# Altium PCB 0.PCB1.PcbDoc (part 2 of 12)
Units mm, origin at the board's own origin, x right, y up, seen from the top; angles counter-clockwise.
Board outline 77 x 72 mm, 6 copper layers (Top Layer, Layer 1, Layer 3, Layer 4, Layer 2, Bottom Layer), stack 1.538 mm thick; 570 components, 490 nets, 3331 pads, 1909 vias.
Unrouted connection lines stored in the file: 2.
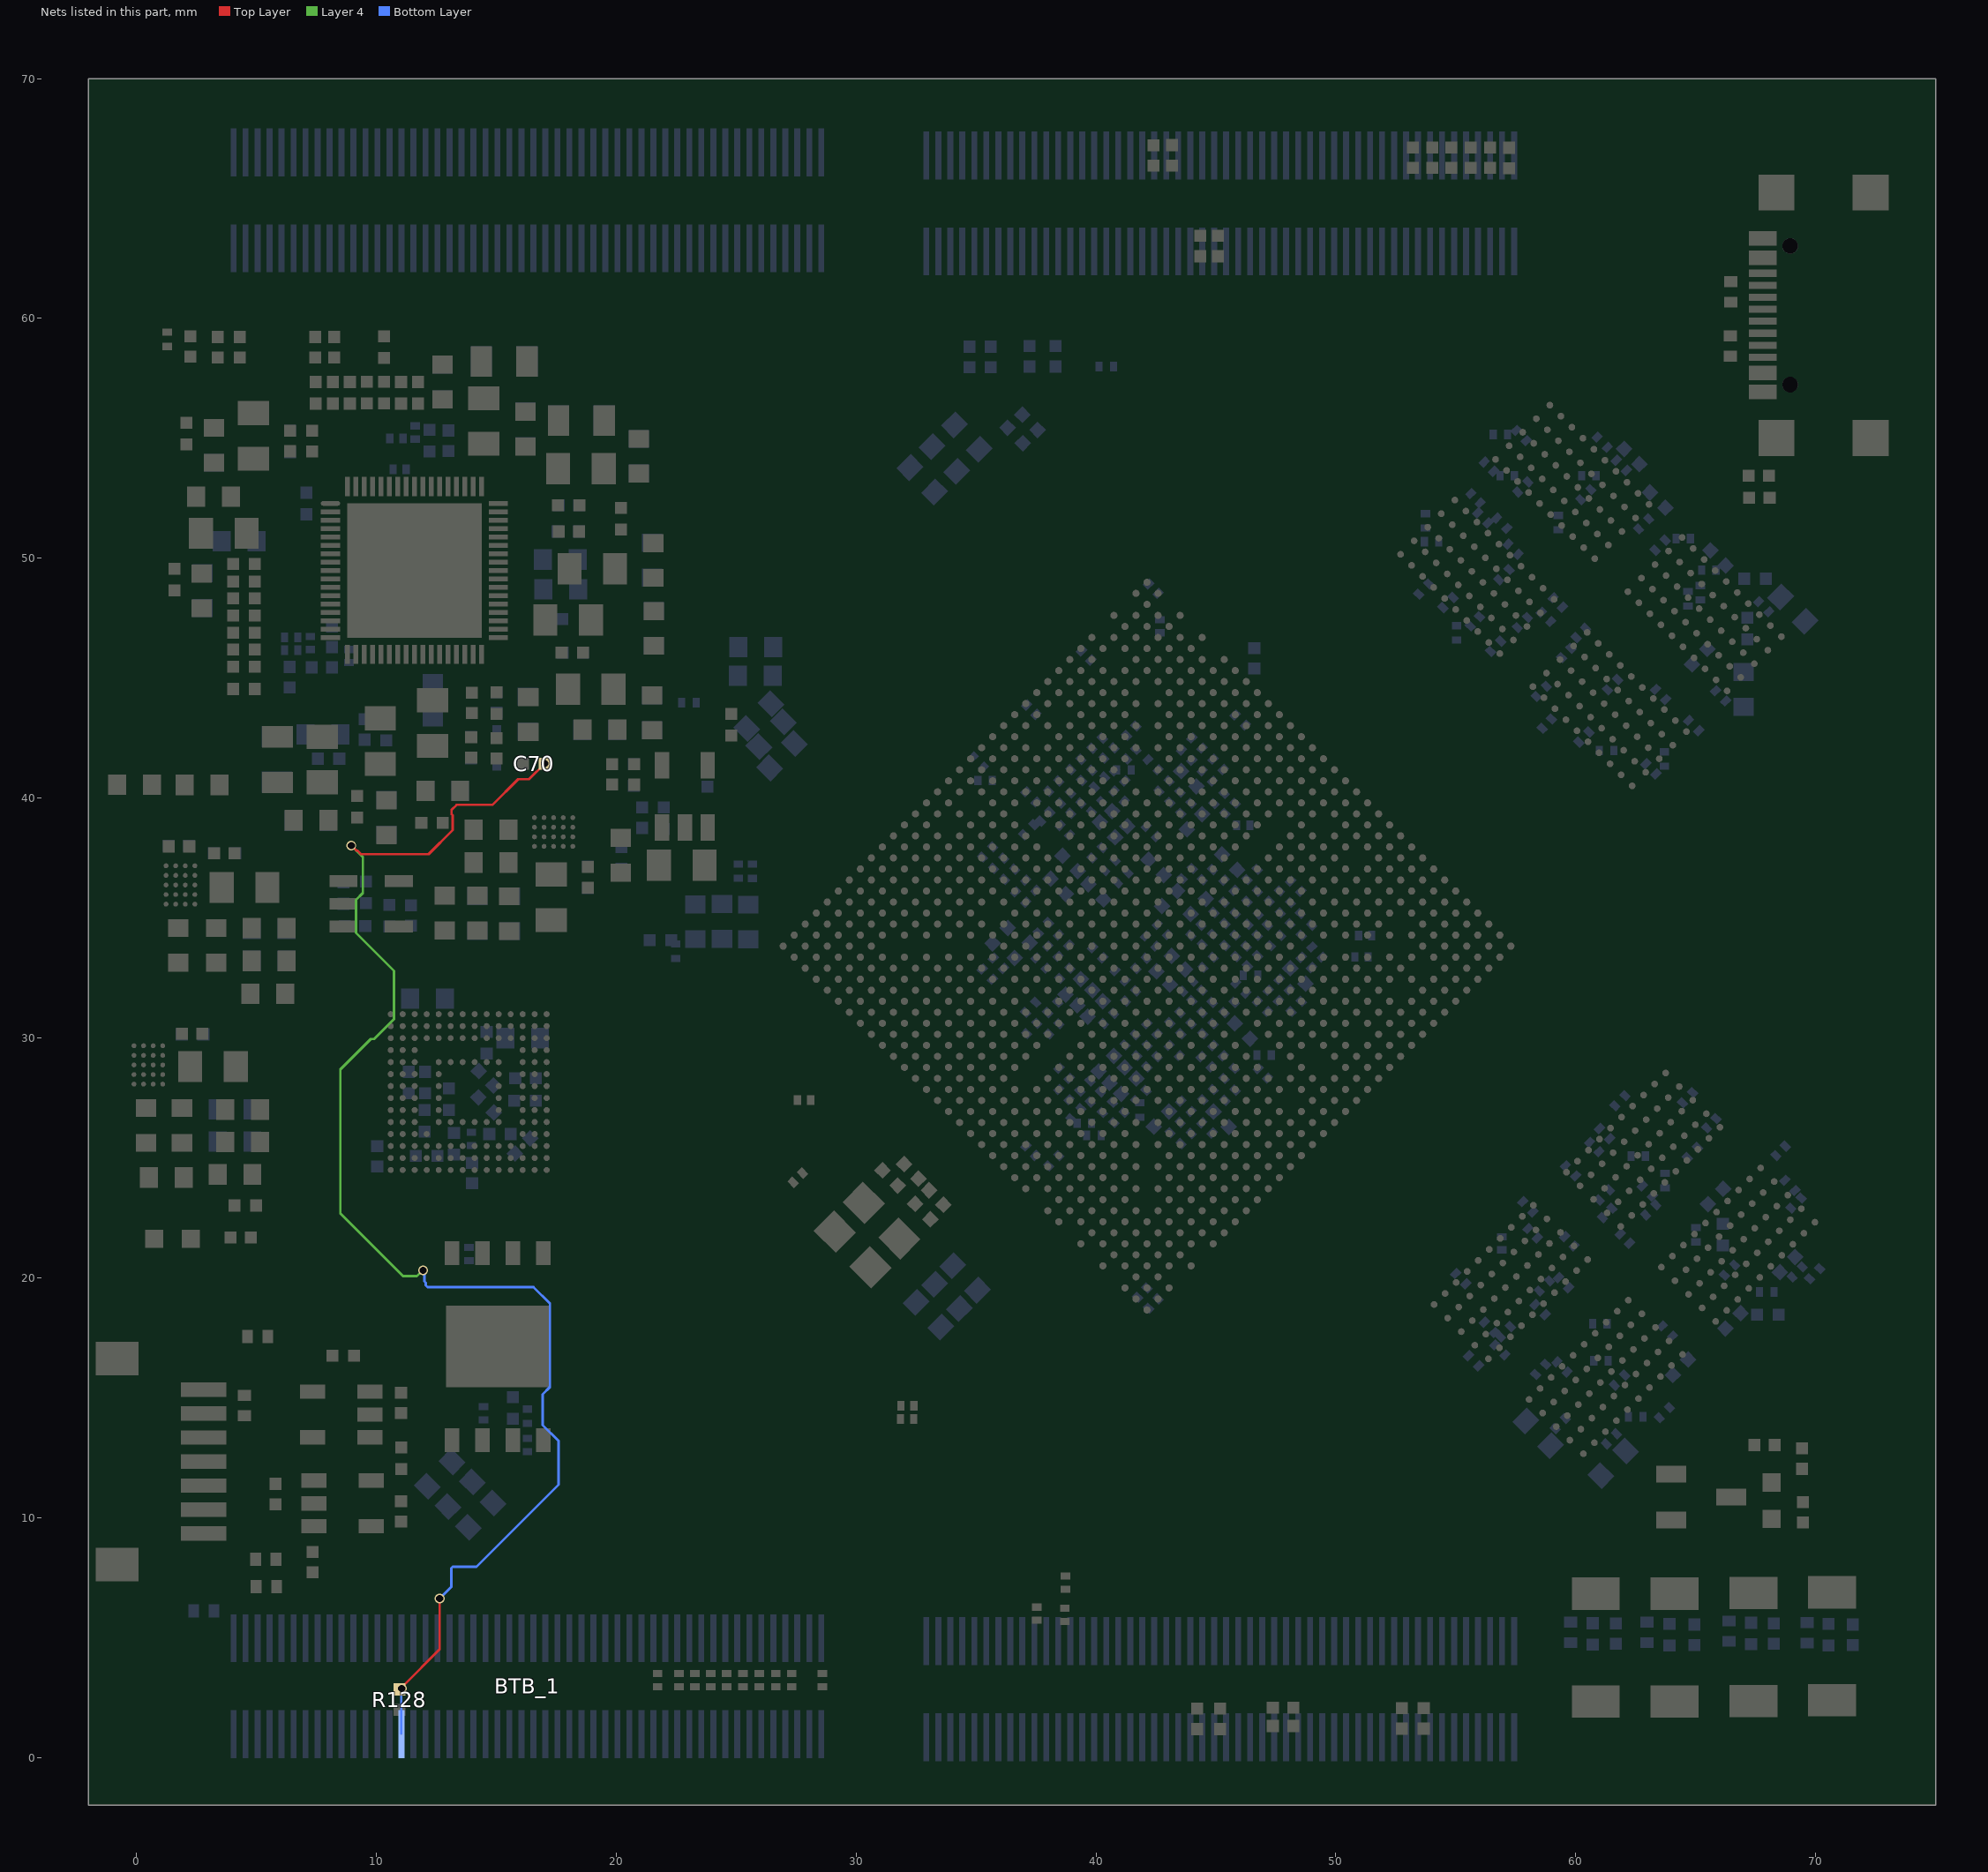
[diagram p6: the nets of this part, all layers, seen from the top]

## Components (designator, comment, footprint, x,y, rotation, side; value= is the part's Value field where it differs from the comment) (continued)
R30 "510K" R0402_L 33.34,23.345 r135 top
R31 "0R" R0201_L 37.281,25.296 r135 bottom
R32 "0R" R0201_L 10.84,54.989 r0 bottom
R33 "22R" R0201_L 7.254,46.467 r270 bottom
R34 "22R" R0201_L 32.133,14.115 r180 top
R35 "22R" R0201_L 8.859,45.921 r90 bottom
R36 "22R" R0201_L 32.14,14.664 r180 top
R37 "100K" R0201_L 6.456,46.167 r0 bottom
R38 "100K" R0201_L 11.627,55.243 r270 bottom
R39 "2.2K" R0201_L 37.535,5.992 r90 top
R40 "120K" R0201_L 6.456,46.696 r0 bottom
R41 "2.2K" R0201_L 38.729,7.288 r270 top
R42 "120K" R0201_L 10.972,53.712 r0 bottom
R43 "2.2K" R0201_L 38.704,5.941 r90 top
R44 "2.2K" R0201_L 28.595,3.224 r90 top
R45 "240R" R0201_L 46.146,38.86 r180 bottom
R46 "240R" R0201_L 51.226,34.262 r0 bottom
R47 "240R" R0201_L 51.074,33.373 r0 bottom
R48 "240R" R0201_L 46.959,28.522 r315 bottom
R49 "1K" R0402_L 69.438,12.457 r90 top
R50 "10K" R0402_L 67.871,13.023 r180 top
R51 "0R" R0201_L 27.574,24.168 r225 top
R52 "0R" R0201_L 27.833,27.412 r180 top
R53 "22R" R0402_L 46.603,45.826 r90 bottom
R54 "200R" R0201_L 37.307,43.686 r315 bottom
R55 "8.2K" R0201_L 37.882,39.232 r225 bottom
R56 "200R" R0201_L 39.593,45.946 r315 bottom
R57 "200R" R0201_L 41.472,41.832 r225 bottom
R58 "200R" R0201_L 41.473,42.809 r45 bottom
R59 "8.2K" R0201_L 38.704,38.657 r315 bottom
R60 "10K" R0402_L 2.255,58.824 r270 top
R61 "1K" R0402_L 37.231,58.418 r270 bottom
R62 "100K" R0402_L 4.312,58.799 r270 top
R63 "10K" R0402_L 38.323,58.418 r90 bottom
R64 "NC" R0402_L 3.398,58.799 r90 top
R65 "0R" R0402_L 8.249,58.799 r270 top
R67 "NC" R0402_L 7.462,58.799 r270 top
R69 "8.2K" R0201_L 42.666,47.166 r270 bottom
R70 "8.2K" R0201_L 42.396,48.732 r135 bottom
R72 "200R" R0201_L 41.93,19.378 r45 bottom
R73 "200R" R0201_L 42.395,18.923 r225 bottom
R83 "10K" R0201_L 55.798,47.369 r45 bottom
R84 "10K" R0201_L 58.795,43.102 r45 bottom
R85 "240R" R0201_L 55.823,52.5 r135 bottom
R86 "240R" R0201_L 56.382,53.82 r135 bottom
R87 "49.9R" R0201_L 58.764,47.552 r135 bottom
R88 "49.9R" R0201_L 59.608,46.048 r45 bottom
R89 "49.9R" R0201_L 59.252,48.156 r135 bottom
R90 "49.9R" R0201_L 60.218,46.886 r45 bottom
R93 "10K" R0201_L 60.776,25.449 r315 bottom
R94 "10K" R0201_L 56.916,21.435 r270 bottom
R95 "240R" R0201_L 65.653,26.439 r45 bottom
R96 "240R" R0201_L 68.54,25.287 r45 bottom
R97 "49.9R" R0201_L 61.311,22.702 r45 bottom
R98 "49.9R" R0201_L 58.203,21.857 r315 bottom
R99 "49.9R" R0201_L 62.054,21.634 r135 bottom
R100 "49.9R" R0201_L 59.738,21.517 r315 bottom
R101 "0R" R0201_L 25.971,3.221 r270 top
R102 "0R" R0201_L 25.286,3.217 r270 top
R103 "0R" R0603_L 12.138,31.641 r180 bottom
R104 "0R" R0603_L 16.102,29.991 r180 bottom
R105 "10K" R0402_L 10.039,25.066 r90 bottom
R106 "10K" R0402_L 16.221,28.319 r180 bottom
R107 "10K" R0402_L 14.577,28.319 r315 bottom
R108 "NC" R0402_L 13.992,24.364 r90 bottom
R109 "NC" R0201_L 16.301,13.024 r270 bottom
R110 "NC" R0201_L 13.868,20.983 r270 bottom
R111 "0R" R0201_L 23.279,3.217 r270 top
R112 "0R" R0201_L 24.6,3.217 r270 top
R113 "0R" R0201_L 23.939,3.221 r270 top
R114 "0R" R0201_L 22.619,3.217 r270 top
R115 "0R" R0201_L 21.73,3.217 r270 top
R116 "0R" R0201_L 26.657,3.217 r270 top
R117 "0R" R0201_L 27.318,3.217 r270 top
R118 "0R" R0201_L 13.967,25.784 r90 bottom
R119 "0R" R0201_L 14.472,14.344 r90 bottom
R120 "0R" R0402_L 45.181,1.605 r90 top
R121 "0R" R0402_L 44.216,1.605 r90 top
R122 "100R" R0402_L 7.346,8.136 r90 top
R123 "0R" R0402_L 11.033,10.251 r90 top
R124 "0R" R0402_L 52.75,1.623 r90 top
R125 "0R" R0402_L 53.664,1.623 r90 top
R126 "100R" R0402_L 5.797,10.981 r90 top
R127 "0R" R0402_L 11.033,14.779 r90 top
R128 "0R" R0402_L 10.967,2.411 r270 top
R129 "2.2R" R0402_L 67.66,52.525 r180 top
R130 "0R" R0402_L 45.079,63.015 r270 top
R131 "2.2R" R0402_L 67.634,53.439 r180 top
R132 "0R" R0402_L 44.343,63.015 r270 top
R133 "100R" R0402_L 61.675,5.162 r270 bottom
R134 "NC" R0402_L 43.174,66.8 r270 top
R135 "4.7K" R0402_L 42.406,66.79 r270 top
R136 "100R" R0402_L 64.951,5.111 r270 bottom
R137 "4.7K" R0402_L 4.351,21.673 r0 top
R138 "100R" R0402_L 68.253,5.162 r270 bottom
R139 "NC" R0402_L 57.22,66.691 r90 top
R140 "NC" R0402_L 54.807,66.698 r90 top
R141 "NC" R0402_L 54.02,66.698 r90 top
R142 "100R" R0402_L 71.555,5.111 r270 bottom
R143 "NC" R0402_L 53.207,66.698 r90 top
R144 "NC" R0402_L 56.433,66.698 r90 top
R145 "NC" R0402_L 55.62,66.698 r90 top
R146 "NC" R0402_L 47.799,2.07 r0 top
R147 "NC" R0402_L 47.799,1.308 r0 top
SW1 "GT-TC029B-H020-L1N" SW-SMD_L3.9-W2.9-P4.15-LS5.0 60.839,4.574 r90 top
SW2 "GT-TC029B-H020-L1N" SW-SMD_L3.9-W2.9-P4.15-LS5.0 64.115,4.574 r90 top
SW3 "GT-TC029B-H020-L1N" SW-SMD_L3.9-W2.9-P4.15-LS5.0 67.417,4.599 r90 top
SW4 "GT-TC029B-H020-L1N" SW-SMD_L3.9-W2.9-P4.15-LS5.0 70.692,4.629 r90 top
U1 "PMIC_RK806" QFN68_7R00X7R00X0R80_T 11.59,49.489 r0 top
U2 "B5819WT" SOD-523_L1.2-W0.8-LS1.6-RD 15.019,42.067 r90 bottom
U3 "RK860-2" WLCSP-20_L2.0-W1.6-R5-C4-P0.40-TL 1.707,36.376 r0 top
U4 "LPW5209AB5F" SOT-23-5_L3.0-W1.7-P0.95-LS2.8-BL 10.346,38.222 r270 top
U5 "RK860-3" WLCSP-20_L2.0-W1.6-R5-C4-P0.40-TL 0.369,28.871 r0 top
U6 "RK860-2" WLCSP-20_L2.0-W1.6-R5-C4-P0.40-TL 17.393,38.714 r270 top
U7 "RT8097CHGB" SOT-23-5_L3.0-W1.7-P0.95-LS2.8-BR 22.863,40.068 r270 top
U8 "RK3588" BGA1088_23R00X23R00X2R00 42.13,33.826 r225 top locked
U9 "CXDB5CCAM-ML" FBGA-200_L15.0-W10.0-BL_K4F6E3S4HM 60.426,48.395 r315 top locked
U10 "CXDB5CCAM-ML" FBGA-200_L15.0-W10.0-BL_K4F6E3S4HM 61.986,20.81 r225 top
U11 "KLMBG2JETD-B041" FBGA-153 13.852,27.741 r0 top
U12 "W25Q256JWEIQ_C2980994" WSON-8_L8.0-W6.0-P1.27-TL-EP-1 15.056,17.279 r270 top
U13 "D2315-3R3" DFN1006-2L-BI 66.441,58.85 r90 top
U14 "SN74LVC1G125DBVR" SOT23-5 8.594,10.588 r0 top
U15 "D2315-3R3" DFN1006-2L-BI 66.466,61.104 r270 top
U16 "SN74LVC1G125DBVR" SOT23-5 8.543,14.296 r180 top
U17 "D2315-3R3" DFN1006-2L-BI 59.795,5.213 r90 bottom
U18 "D2315-3R3" DFN1006-2L-BI 5.416,7.12 r180 top
U19 "D2315-3R3" DFN1006-2L-BI 5.397,8.263 r180 top
U20 "D2315-3R3" DFN1006-2L-BI 62.97,5.213 r90 bottom
U21 "D2315-3R3" DFN1006-2L-BI 66.399,5.264 r90 bottom
U22 "D2315-3R3" DFN1006-2L-BI 69.65,5.194 r90 bottom
U23 "D2315-3R3" DFN1006-2L-BI 2.809,6.101 r0 bottom
U24 "D2315-3R3" DFN1006-2L-BI 4.498,14.671 r270 top
U25 "D2315-3R3" DFN1006-2L-BI 5.054,17.547 r0 top
USBC1 "ZX-TYPEC-WTM1628" USB-C-SMD_ZX-TYPEC-WTM1628 71.188,60.13 r90 top
X1 "24M" XTAL-3225-4P 30.462,21.778 r315 top

## Footprints (in the part's own frame and the unit in brackets; to place one, negate y for a bottom-side part, rotate by r counter-clockwise, add the part's x,y. Pads: shape width x height; smd on the part's side, far side on the other; paste and mask are expansions set on the pad)
BGA1088_23R00X23R00X2R00 [mm] "BGA1088_23R00X23R00X2R00"
  round 0.3 smd: A1(-10.725,10.725) A2(-10.075,10.725) A3(-9.425,10.725) A4(-8.775,10.725) A5(-8.125,10.725) A6(-7.475,10.725) A7(-6.825,10.725) A8(-6.175,10.725) A9(-5.525,10.725) A10(-4.875,10.725) A11(-4.225,10.725) A12(-3.575,10.725) A13(-2.925,10.725) A14(-2.275,10.725) A15(-1.625,10.725) A16(-0.975,10.725) A17(-0.325,10.725) A18(0.325,10.725) A19(0.975,10.725) A20(1.625,10.725) A21(2.275,10.725) A22(2.925,10.725) A23(3.575,10.725) A24(4.225,10.725) A25(4.875,10.725) A26(5.525,10.725) A27(6.175,10.725) A28(6.825,10.725) A30(8.125,10.725) A32(9.425,10.725) A33(10.075,10.725) A34(10.725,10.725) AA1(-10.725,-2.275) AA2(-10.075,-2.275) AA3(-9.425,-2.275) AA4(-8.775,-2.275) AA5(-8.125,-2.275) AA6(-7.475,-2.275) AA7(-6.825,-2.275) AA8(-6.175,-2.275) AA9(-5.525,-2.275) AA10(-4.875,-2.275) AA11(-4.225,-2.275) AA12(-3.575,-2.275) AA13(-2.925,-2.275) AA14(-2.275,-2.275) AA15(-1.625,-2.275) AA16(-0.975,-2.275) AA17(-0.325,-2.275) AA18(0.325,-2.275) AA19(0.975,-2.275) AA20(1.625,-2.275) AA21(2.275,-2.275) AA22(2.925,-2.275) AA23(3.575,-2.275) AA24(4.225,-2.275) AA25(4.875,-2.275) AA26(5.525,-2.275) AA27(6.175,-2.275) AA28(6.825,-2.275) AA29(7.475,-2.275) AA30(8.125,-2.275) AA31(8.775,-2.275) AA32(9.425,-2.275) AA33(10.075,-2.275) AA34(10.725,-2.275) AB1(-10.725,-2.925) AB2(-10.075,-2.925) AB3(-9.425,-2.925) AB4(-8.775,-2.925) AB5(-8.125,-2.925) AB6(-7.475,-2.925) AB7(-6.825,-2.925) AB8(-6.175,-2.925) AB9(-5.525,-2.925) AB10(-4.875,-2.925) AB11(-4.225,-2.925) AB12(-3.575,-2.925) AB13(-2.925,-2.925) AB14(-2.275,-2.925) AB15(-1.625,-2.925) AB16(-0.975,-2.925) AB17(-0.325,-2.925) AB18(0.325,-2.925) AB19(0.975,-2.925) AB20(1.625,-2.925) AB21(2.275,-2.925) AB22(2.925,-2.925) AB23(3.575,-2.925) AB24(4.225,-2.925) AB25(4.875,-2.925) AB26(5.525,-2.925) AB27(6.175,-2.925) AB28(6.825,-2.925) AB29(7.475,-2.925) AB30(8.125,-2.925) AB31(8.775,-2.925) AB32(9.425,-2.925) AB33(10.075,-2.925) AB34(10.725,-2.925) AC1(-10.725,-3.575) AC2(-10.075,-3.575) AC3(-9.425,-3.575) AC4(-8.775,-3.575) AC5(-8.125,-3.575) AC6(-7.475,-3.575) AC7(-6.825,-3.575) AC8(-6.175,-3.575) AC9(-5.525,-3.575) AC10(-4.875,-3.575) AC11(-4.225,-3.575) AC12(-3.575,-3.575) AC13(-2.925,-3.575) AC14(-2.275,-3.575) AC15(-1.625,-3.575) AC16(-0.975,-3.575) AC17(-0.325,-3.575) AC18(0.325,-3.575) AC19(0.975,-3.575) AC20(1.625,-3.575) AC21(2.275,-3.575) AC22(2.925,-3.575) AC23(3.575,-3.575) AC24(4.225,-3.575) AC25(4.875,-3.575) AC26(5.525,-3.575) AC27(6.175,-3.575) AC28(6.825,-3.575) AC29(7.475,-3.575) AC30(8.125,-3.575) AC31(8.775,-3.575) AC32(9.425,-3.575) AC33(10.075,-3.575) AC34(10.725,-3.575) AD1(-10.725,-4.225) AD2(-10.075,-4.225) AD3(-9.425,-4.225) AD4(-8.775,-4.225) AD5(-8.125,-4.225) AD6(-7.475,-4.225) AD7(-6.825,-4.225) AD8(-6.175,-4.225) AD9(-5.525,-4.225) AD10(-4.875,-4.225) AD11(-4.225,-4.225) AD12(-3.575,-4.225) AD13(-2.925,-4.225) AD14(-2.275,-4.225) AD15(-1.625,-4.225) AD16(-0.975,-4.225) AD17(-0.325,-4.225) AD18(0.325,-4.225) AD19(0.975,-4.225) AD20(1.625,-4.225) AD21(2.275,-4.225) AD22(2.925,-4.225) AD23(3.575,-4.225) AD24(4.225,-4.225) AD25(4.875,-4.225) AD26(5.525,-4.225) AD27(6.175,-4.225) AD28(6.825,-4.225) AD29(7.475,-4.225) AD30(8.125,-4.225) AD31(8.775,-4.225) AD32(9.425,-4.225) AD33(10.075,-4.225) AD34(10.725,-4.225) AE1(-10.725,-4.875) AE2(-10.075,-4.875) AE3(-9.425,-4.875) AE4(-8.775,-4.875) AE5(-8.125,-4.875) AE6(-7.475,-4.875) AE7(-6.825,-4.875) AE8(-6.175,-4.875) AE9(-5.525,-4.875) AE11(-4.225,-4.875) AE12(-3.575,-4.875) AE13(-2.925,-4.875) AE14(-2.275,-4.875) AE15(-1.625,-4.875) AE16(-0.975,-4.875) AE18(0.325,-4.875) AE19(0.975,-4.875) AE20(1.625,-4.875) AE21(2.275,-4.875) AE22(2.925,-4.875) AE23(3.575,-4.875) AE24(4.225,-4.875) AE26(5.525,-4.875) AE27(6.175,-4.875) AE28(6.825,-4.875) AE29(7.475,-4.875) AE30(8.125,-4.875) AE31(8.775,-4.875) AE32(9.425,-4.875) AE33(10.075,-4.875) AE34(10.725,-4.875) AF1(-10.725,-5.525) AF2(-10.075,-5.525) AF3(-9.425,-5.525) AF4(-8.775,-5.525) AF5(-8.125,-5.525) AF6(-7.475,-5.525) AF7(-6.825,-5.525) AF8(-6.175,-5.525) AF11(-4.225,-5.525) AF12(-3.575,-5.525) AF13(-2.925,-5.525) AF14(-2.275,-5.525) AF15(-1.625,-5.525) AF16(-0.975,-5.525) AF18(0.325,-5.525) AF19(0.975,-5.525) AF20(1.625,-5.525) AF21(2.275,-5.525) AF22(2.925,-5.525) AF24(4.225,-5.525) AF25(4.875,-5.525) AF27(6.175,-5.525) AF28(6.825,-5.525) AF29(7.475,-5.525) AF30(8.125,-5.525) AF31(8.775,-5.525) AF32(9.425,-5.525) AF33(10.075,-5.525) AF34(10.725,-5.525) AG1(-10.725,-6.175) AG2(-10.075,-6.175) AG3(-9.425,-6.175) AG4(-8.775,-6.175) AG5(-8.125,-6.175) AG6(-7.475,-6.175) AG7(-6.825,-6.175) AG9(-5.525,-6.175) AG10(-4.875,-6.175) AG11(-4.225,-6.175) AG12(-3.575,-6.175) AG13(-2.925,-6.175) AG14(-2.275,-6.175) AG15(-1.625,-6.175) AG16(-0.975,-6.175) AG18(0.325,-6.175) AG19(0.975,-6.175) AG20(1.625,-6.175) AG21(2.275,-6.175) AG22(2.925,-6.175) AG23(3.575,-6.175) AG24(4.225,-6.175) AG25(4.875,-6.175) AG26(5.525,-6.175) AG28(6.825,-6.175) AG29(7.475,-6.175) AG30(8.125,-6.175) AG31(8.775,-6.175) AG32(9.425,-6.175) AG33(10.075,-6.175) AG34(10.725,-6.175) AH2(-10.075,-6.825) AH3(-9.425,-6.825) AH4(-8.775,-6.825) AH5(-8.125,-6.825) AH6(-7.475,-6.825) AH8(-6.175,-6.825) AH9(-5.525,-6.825) AH10(-4.875,-6.825) AH11(-4.225,-6.825) AH12(-3.575,-6.825) AH13(-2.925,-6.825) AH14(-2.275,-6.825) AH15(-1.625,-6.825) AH16(-0.975,-6.825) AH18(0.325,-6.825) AH19(0.975,-6.825) AH20(1.625,-6.825) AH21(2.275,-6.825) AH22(2.925,-6.825) AH23(3.575,-6.825) AH24(4.225,-6.825) AH25(4.875,-6.825) AH26(5.525,-6.825) AH27(6.175,-6.825) AH29(7.475,-6.825) AH30(8.125,-6.825) AH31(8.775,-6.825) AH32(9.425,-6.825) AH33(10.075,-6.825) AH34(10.725,-6.825) AJ1(-10.725,-7.475) AJ2(-10.075,-7.475) AJ3(-9.425,-7.475) AJ4(-8.775,-7.475) AJ5(-8.125,-7.475) AJ7(-6.825,-7.475) AJ8(-6.175,-7.475) AJ9(-5.525,-7.475) AJ10(-4.875,-7.475) AJ11(-4.225,-7.475) AJ12(-3.575,-7.475) AJ13(-2.925,-7.475) AJ14(-2.275,-7.475) AJ15(-1.625,-7.475) AJ16(-0.975,-7.475) AJ18(0.325,-7.475) AJ19(0.975,-7.475) AJ20(1.625,-7.475) AJ21(2.275,-7.475) AJ22(2.925,-7.475) AJ23(3.575,-7.475) AJ24(4.225,-7.475) AJ25(4.875,-7.475) AJ26(5.525,-7.475) AJ27(6.175,-7.475) AJ28(6.825,-7.475) AJ30(8.125,-7.475) AJ31(8.775,-7.475) AJ32(9.425,-7.475) AJ33(10.075,-7.475) AJ34(10.725,-7.475) AK2(-10.075,-8.125) AK3(-9.425,-8.125) AK4(-8.775,-8.125) AK5(-8.125,-8.125) AK6(-7.475,-8.125) AK7(-6.825,-8.125) AK8(-6.175,-8.125) AK9(-5.525,-8.125) AK10(-4.875,-8.125) AK11(-4.225,-8.125) AK12(-3.575,-8.125) AK13(-2.925,-8.125) AK14(-2.275,-8.125) AK15(-1.625,-8.125) AK16(-0.975,-8.125) AK17(-0.325,-8.125) AK18(0.325,-8.125) AK19(0.975,-8.125) AK20(1.625,-8.125) AK21(2.275,-8.125) AK22(2.925,-8.125) AK23(3.575,-8.125) AK24(4.225,-8.125) AK25(4.875,-8.125) AK26(5.525,-8.125) AK27(6.175,-8.125) AK28(6.825,-8.125) AK29(7.475,-8.125) AK30(8.125,-8.125) AK31(8.775,-8.125) AK32(9.425,-8.125) AK33(10.075,-8.125) AK34(10.725,-8.125) AL1(-10.725,-8.775) AL2(-10.075,-8.775) AL3(-9.425,-8.775) AL4(-8.775,-8.775) AL5(-8.125,-8.775) AL6(-7.475,-8.775) AL7(-6.825,-8.775) AL8(-6.175,-8.775) AL9(-5.525,-8.775) AL10(-4.875,-8.775) AL11(-4.225,-8.775) AL12(-3.575,-8.775) AL13(-2.925,-8.775) AL14(-2.275,-8.775) AL15(-1.625,-8.775) AL16(-0.975,-8.775) AL17(-0.325,-8.775) AL18(0.325,-8.775) AL19(0.975,-8.775) AL20(1.625,-8.775) AL21(2.275,-8.775) AL22(2.925,-8.775) AL23(3.575,-8.775) AL24(4.225,-8.775) AL25(4.875,-8.775) AL26(5.525,-8.775) AL27(6.175,-8.775) AL28(6.825,-8.775) AL29(7.475,-8.775) AL30(8.125,-8.775) AL31(8.775,-8.775) AL32(9.425,-8.775) AL33(10.075,-8.775) AL34(10.725,-8.775) AM2(-10.075,-9.425) AM3(-9.425,-9.425) AM4(-8.775,-9.425) AM5(-8.125,-9.425) AM7(-6.825,-9.425) AM8(-6.175,-9.425) AM9(-5.525,-9.425) AM10(-4.875,-9.425) AM12(-3.575,-9.425) AM14(-2.275,-9.425) AM15(-1.625,-9.425) AM16(-0.975,-9.425) AM17(-0.325,-9.425) AM18(0.325,-9.425) AM20(1.625,-9.425) AM22(2.925,-9.425) AM23(3.575,-9.425) AM24(4.225,-9.425) AM25(4.875,-9.425) AM26(5.525,-9.425) AM27(6.175,-9.425) AM28(6.825,-9.425) AM29(7.475,-9.425) AM30(8.125,-9.425) AM31(8.775,-9.425) AM32(9.425,-9.425) AM33(10.075,-9.425) AM34(10.725,-9.425) AN1(-10.725,-10.075) AN2(-10.075,-10.075) AN3(-9.425,-10.075) AN4(-8.775,-10.075) AN5(-8.125,-10.075) AN6(-7.475,-10.075) AN7(-6.825,-10.075) AN8(-6.175,-10.075) AN9(-5.525,-10.075) AN10(-4.875,-10.075) AN11(-4.225,-10.075) AN12(-3.575,-10.075) AN13(-2.925,-10.075) AN14(-2.275,-10.075) AN15(-1.625,-10.075) AN16(-0.975,-10.075) AN17(-0.325,-10.075) AN18(0.325,-10.075) AN19(0.975,-10.075) AN20(1.625,-10.075) AN21(2.275,-10.075) AN22(2.925,-10.075) AN23(3.575,-10.075) AN24(4.225,-10.075) AN25(4.875,-10.075) AN26(5.525,-10.075) AN27(6.175,-10.075) AN28(6.825,-10.075) AN29(7.475,-10.075) AN30(8.125,-10.075) AN31(8.775,-10.075) AN32(9.425,-10.075) AN33(10.075,-10.075) AN34(10.725,-10.075) AP1(-10.725,-10.725) AP2(-10.075,-10.725) AP4(-8.775,-10.725) AP6(-7.475,-10.725) AP7(-6.825,-10.725) AP8(-6.175,-10.725) AP9(-5.525,-10.725) AP10(-4.875,-10.725) AP11(-4.225,-10.725) AP12(-3.575,-10.725) AP13(-2.925,-10.725) AP14(-2.275,-10.725) AP15(-1.625,-10.725) AP16(-0.975,-10.725) AP17(-0.325,-10.725) AP18(0.325,-10.725) AP19(0.975,-10.725) AP20(1.625,-10.725) AP21(2.275,-10.725) AP22(2.925,-10.725) AP23(3.575,-10.725) AP24(4.225,-10.725) AP25(4.875,-10.725) AP26(5.525,-10.725) AP27(6.175,-10.725) AP28(6.825,-10.725) AP29(7.475,-10.725) AP30(8.125,-10.725) AP31(8.775,-10.725) AP32(9.425,-10.725) AP33(10.075,-10.725) AP34(10.725,-10.725) B1(-10.725,10.075) B2(-10.075,10.075) B3(-9.425,10.075) B4(-8.775,10.075) B5(-8.125,10.075) B6(-7.475,10.075) B7(-6.825,10.075) B8(-6.175,10.075) B9(-5.525,10.075) B10(-4.875,10.075) B11(-4.225,10.075) B12(-3.575,10.075) B13(-2.925,10.075) B14(-2.275,10.075) B15(-1.625,10.075) B16(-0.975,10.075) B17(-0.325,10.075) B18(0.325,10.075) B19(0.975,10.075) B20(1.625,10.075) B21(2.275,10.075) B22(2.925,10.075) B23(3.575,10.075) B24(4.225,10.075) B25(4.875,10.075) B26(5.525,10.075) B27(6.175,10.075) B28(6.825,10.075) B29(7.475,10.075) B30(8.125,10.075) B31(8.775,10.075) B32(9.425,10.075) B33(10.075,10.075) B34(10.725,10.075) C1(-10.725,9.425) C2(-10.075,9.425) C3(-9.425,9.425) C4(-8.775,9.425) C5(-8.125,9.425) C6(-7.475,9.425) C7(-6.825,9.425) C8(-6.175,9.425) C9(-5.525,9.425) C10(-4.875,9.425) C11(-4.225,9.425) C12(-3.575,9.425) C13(-2.925,9.425) C14(-2.275,9.425) C15(-1.625,9.425) C16(-0.975,9.425) C17(-0.325,9.425) C18(0.325,9.425) C19(0.975,9.425) C20(1.625,9.425) C21(2.275,9.425) C22(2.925,9.425) C23(3.575,9.425) C24(4.225,9.425) C25(4.875,9.425) C26(5.525,9.425) C27(6.175,9.425) C28(6.825,9.425) C29(7.475,9.425) C30(8.125,9.425) C31(8.775,9.425) C32(9.425,9.425) C33(10.075,9.425) C34(10.725,9.425) D1(-10.725,8.775) D2(-10.075,8.775) D3(-9.425,8.775) D4(-8.775,8.775) D5(-8.125,8.775) D7(-6.825,8.775) D9(-5.525,8.775) D10(-4.875,8.775) D11(-4.225,8.775) D13(-2.925,8.775) D14(-2.275,8.775) D16(-0.975,8.775) D17(-0.325,8.775) D19(0.975,8.775) D20(1.625,8.775) D21(2.275,8.775) D22(2.925,8.775) D23(3.575,8.775) D24(4.225,8.775) D25(4.875,8.775) D26(5.525,8.775) D27(6.175,8.775) D28(6.825,8.775) D29(7.475,8.775) D30(8.125,8.775) D31(8.775,8.775) D32(9.425,8.775) D33(10.075,8.775) E1(-10.725,8.125) E2(-10.075,8.125) E3(-9.425,8.125) E4(-8.775,8.125) E5(-8.125,8.125) E6(-7.475,8.125) E7(-6.825,8.125) E8(-6.175,8.125) E9(-5.525,8.125) E10(-4.875,8.125) E11(-4.225,8.125) E12(-3.575,8.125) E13(-2.925,8.125) E14(-2.275,8.125) E16(-0.975,8.125) E17(-0.325,8.125) E18(0.325,8.125) E19(0.975,8.125) E20(1.625,8.125) E21(2.275,8.125) E22(2.925,8.125) E23(3.575,8.125) E24(4.225,8.125) E25(4.875,8.125) E26(5.525,8.125) E27(6.175,8.125) E28(6.825,8.125) E29(7.475,8.125) E30(8.125,8.125) E31(8.775,8.125) E32(9.425,8.125) E33(10.075,8.125) E34(10.725,8.125) F1(-10.725,7.475) F2(-10.075,7.475) F3(-9.425,7.475) F4(-8.775,7.475) F5(-8.125,7.475) F7(-6.825,7.475) F8(-6.175,7.475) F9(-5.525,7.475) F10(-4.875,7.475) F11(-4.225,7.475) F12(-3.575,7.475) F13(-2.925,7.475) F14(-2.275,7.475) F15(-1.625,7.475) F16(-0.975,7.475) F18(0.325,7.475) F19(0.975,7.475) F20(1.625,7.475) F21(2.275,7.475) F22(2.925,7.475) F23(3.575,7.475) F24(4.225,7.475) F25(4.875,7.475) F26(5.525,7.475) F27(6.175,7.475) F28(6.825,7.475) F30(8.125,7.475) F31(8.775,7.475) F32(9.425,7.475) F33(10.075,7.475) G1(-10.725,6.825) G2(-10.075,6.825) G3(-9.425,6.825) G4(-8.775,6.825) G6(-7.475,6.825) G8(-6.175,6.825) G9(-5.525,6.825) G10(-4.875,6.825) G11(-4.225,6.825) G12(-3.575,6.825) G13(-2.925,6.825) G14(-2.275,6.825) G15(-1.625,6.825) G16(-0.975,6.825) G18(0.325,6.825) G19(0.975,6.825) G20(1.625,6.825) G21(2.275,6.825) G22(2.925,6.825) G23(3.575,6.825) G24(4.225,6.825) G25(4.875,6.825) G26(5.525,6.825) G27(6.175,6.825) G29(7.475,6.825) G30(8.125,6.825) G31(8.775,6.825) G32(9.425,6.825) G33(10.075,6.825) G34(10.725,6.825) H1(-10.725,6.175) H2(-10.075,6.175) H3(-9.425,6.175) H4(-8.775,6.175) H5(-8.125,6.175) H6(-7.475,6.175) H7(-6.825,6.175) H9(-5.525,6.175) H10(-4.875,6.175) H11(-4.225,6.175) H12(-3.575,6.175) H13(-2.925,6.175) H14(-2.275,6.175) H15(-1.625,6.175) H16(-0.975,6.175) H18(0.325,6.175) H19(0.975,6.175) H20(1.625,6.175) H21(2.275,6.175) H22(2.925,6.175) H23(3.575,6.175) H24(4.225,6.175) H25(4.875,6.175) H26(5.525,6.175) H28(6.825,6.175) H29(7.475,6.175) H30(8.125,6.175) H31(8.775,6.175) H32(9.425,6.175) H33(10.075,6.175) J1(-10.725,5.525) J2(-10.075,5.525) J3(-9.425,5.525) J4(-8.775,5.525) J5(-8.125,5.525) J6(-7.475,5.525) J7(-6.825,5.525) J8(-6.175,5.525) J10(-4.875,5.525) J11(-4.225,5.525) J12(-3.575,5.525) J13(-2.925,5.525) J14(-2.275,5.525) J15(-1.625,5.525) J16(-0.975,5.525) J18(0.325,5.525) J19(0.975,5.525) J20(1.625,5.525) J21(2.275,5.525) J22(2.925,5.525) J23(3.575,5.525) J24(4.225,5.525) J25(4.875,5.525) J27(6.175,5.525) J28(6.825,5.525) J29(7.475,5.525) J30(8.125,5.525) J31(8.775,5.525) J32(9.425,5.525) J33(10.075,5.525) J34(10.725,5.525) K1(-10.725,4.875) K2(-10.075,4.875) K3(-9.425,4.875) K4(-8.775,4.875) K5(-8.125,4.875) K6(-7.475,4.875) K7(-6.825,4.875) K8(-6.175,4.875) K9(-5.525,4.875) K11(-4.225,4.875) K12(-3.575,4.875) K13(-2.925,4.875) K14(-2.275,4.875) K15(-1.625,4.875) K16(-0.975,4.875) K18(0.325,4.875) K19(0.975,4.875) K20(1.625,4.875) K21(2.275,4.875) K22(2.925,4.875) K23(3.575,4.875) K24(4.225,4.875) K26(5.525,4.875) K27(6.175,4.875) K28(6.825,4.875) K29(7.475,4.875) K30(8.125,4.875) K31(8.775,4.875) K32(9.425,4.875) K33(10.075,4.875) K34(10.725,4.875) L1(-10.725,4.225) L2(-10.075,4.225) L3(-9.425,4.225) L4(-8.775,4.225) L5(-8.125,4.225) L6(-7.475,4.225) L7(-6.825,4.225) L8(-6.175,4.225) L9(-5.525,4.225) L10(-4.875,4.225) L11(-4.225,4.225) L12(-3.575,4.225) L13(-2.925,4.225) L14(-2.275,4.225) L15(-1.625,4.225) L16(-0.975,4.225) L17(-0.325,4.225) L18(0.325,4.225) L19(0.975,4.225) L20(1.625,4.225) L21(2.275,4.225) L22(2.925,4.225) L23(3.575,4.225) L24(4.225,4.225) L25(4.875,4.225) L26(5.525,4.225) L27(6.175,4.225) L28(6.825,4.225) L29(7.475,4.225) L30(8.125,4.225) L31(8.775,4.225) L32(9.425,4.225) L33(10.075,4.225) M1(-10.725,3.575) M2(-10.075,3.575) M3(-9.425,3.575) M5(-8.125,3.575) M6(-7.475,3.575) M7(-6.825,3.575) M8(-6.175,3.575) M9(-5.525,3.575) M10(-4.875,3.575) M11(-4.225,3.575) M12(-3.575,3.575) M13(-2.925,3.575) M14(-2.275,3.575) M15(-1.625,3.575) M16(-0.975,3.575) M17(-0.325,3.575) M18(0.325,3.575) M19(0.975,3.575) M20(1.625,3.575) M21(2.275,3.575) M22(2.925,3.575) M23(3.575,3.575) M24(4.225,3.575) M25(4.875,3.575) M26(5.525,3.575) M27(6.175,3.575) M28(6.825,3.575) M29(7.475,3.575) M30(8.125,3.575) M31(8.775,3.575) M32(9.425,3.575) M33(10.075,3.575) M34(10.725,3.575) N1(-10.725,2.925) N2(-10.075,2.925) N3(-9.425,2.925) N4(-8.775,2.925) N5(-8.125,2.925) N6(-7.475,2.925) N7(-6.825,2.925) N8(-6.175,2.925) N9(-5.525,2.925) N10(-4.875,2.925) N11(-4.225,2.925) N12(-3.575,2.925) N13(-2.925,2.925) N14(-2.275,2.925) N15(-1.625,2.925) N16(-0.975,2.925) N17(-0.325,2.925) N18(0.325,2.925) N19(0.975,2.925) N20(1.625,2.925) N21(2.275,2.925) N22(2.925,2.925) N23(3.575,2.925) N24(4.225,2.925) N25(4.875,2.925) N26(5.525,2.925) N27(6.175,2.925) N28(6.825,2.925) N29(7.475,2.925) N30(8.125,2.925) N31(8.775,2.925) N32(9.425,2.925) N33(10.075,2.925) N34(10.725,2.925) P1(-10.725,2.275) P2(-10.075,2.275) P3(-9.425,2.275) P4(-8.775,2.275) P5(-8.125,2.275) P6(-7.475,2.275) P7(-6.825,2.275) P8(-6.175,2.275) P9(-5.525,2.275) P10(-4.875,2.275) P11(-4.225,2.275) P12(-3.575,2.275) P13(-2.925,2.275) P14(-2.275,2.275) P15(-1.625,2.275) P16(-0.975,2.275) P17(-0.325,2.275) P18(0.325,2.275) P19(0.975,2.275) P20(1.625,2.275) P21(2.275,2.275) P22(2.925,2.275) P23(3.575,2.275) P24(4.225,2.275) P25(4.875,2.275) P26(5.525,2.275) P27(6.175,2.275) P28(6.825,2.275) P29(7.475,2.275) P30(8.125,2.275) P31(8.775,2.275) P32(9.425,2.275) P33(10.075,2.275) P34(10.725,2.275) R1(-10.725,1.625) R2(-10.075,1.625) R3(-9.425,1.625) R5(-8.125,1.625) R6(-7.475,1.625) R7(-6.825,1.625) R8(-6.175,1.625) R9(-5.525,1.625) R10(-4.875,1.625) R11(-4.225,1.625) R12(-3.575,1.625) R13(-2.925,1.625) R14(-2.275,1.625) R15(-1.625,1.625) R16(-0.975,1.625) R17(-0.325,1.625) R18(0.325,1.625) R19(0.975,1.625) R20(1.625,1.625) R21(2.275,1.625) R22(2.925,1.625) R23(3.575,1.625) R24(4.225,1.625) R25(4.875,1.625) R26(5.525,1.625) R27(6.175,1.625) R28(6.825,1.625) R29(7.475,1.625) R30(8.125,1.625) R31(8.775,1.625) R32(9.425,1.625) R33(10.075,1.625) R34(10.725,1.625) T1(-10.725,0.975) T2(-10.075,0.975) T3(-9.425,0.975) T4(-8.775,0.975) T5(-8.125,0.975) T6(-7.475,0.975) T7(-6.825,0.975) T8(-6.175,0.975) T9(-5.525,0.975) T10(-4.875,0.975) T11(-4.225,0.975) T12(-3.575,0.975) T13(-2.925,0.975) T14(-2.275,0.975) T15(-1.625,0.975) T16(-0.975,0.975) T17(-0.325,0.975) T18(0.325,0.975) T19(0.975,0.975) T20(1.625,0.975) T21(2.275,0.975) T22(2.925,0.975) T23(3.575,0.975) T24(4.225,0.975) T25(4.875,0.975) T26(5.525,0.975) T27(6.175,0.975) T28(6.825,0.975) T29(7.475,0.975) T30(8.125,0.975) T31(8.775,0.975) T32(9.425,0.975) T33(10.075,0.975) T34(10.725,0.975) U1(-10.725,0.325) U2(-10.075,0.325) U3(-9.425,0.325) U4(-8.775,0.325) U5(-8.125,0.325) U11(-4.225,0.325) U12(-3.575,0.325) U13(-2.925,0.325) U14(-2.275,0.325) U15(-1.625,0.325) U16(-0.975,0.325) U17(-0.325,0.325) U18(0.325,0.325) U19(0.975,0.325) U20(1.625,0.325) U21(2.275,0.325) U22(2.925,0.325) U23(3.575,0.325) U24(4.225,0.325) U30(8.125,0.325) U31(8.775,0.325) U32(9.425,0.325) U33(10.075,0.325) U34(10.725,0.325) V1(-10.725,-0.325) V2(-10.075,-0.325) V3(-9.425,-0.325) V4(-8.775,-0.325) V5(-8.125,-0.325) V6(-7.475,-0.325) V7(-6.825,-0.325) V8(-6.175,-0.325) V9(-5.525,-0.325) V10(-4.875,-0.325) V11(-4.225,-0.325) V12(-3.575,-0.325) V13(-2.925,-0.325) V14(-2.275,-0.325) V15(-1.625,-0.325) V16(-0.975,-0.325) V17(-0.325,-0.325) V18(0.325,-0.325) V19(0.975,-0.325) V20(1.625,-0.325) V21(2.275,-0.325) V22(2.925,-0.325) V23(3.575,-0.325) V24(4.225,-0.325) V25(4.875,-0.325) V26(5.525,-0.325) V27(6.175,-0.325) V28(6.825,-0.325) V29(7.475,-0.325) V30(8.125,-0.325) V31(8.775,-0.325) V32(9.425,-0.325) V33(10.075,-0.325) V34(10.725,-0.325) W1(-10.725,-0.975) W2(-10.075,-0.975) W3(-9.425,-0.975) W4(-8.775,-0.975) W5(-8.125,-0.975) W6(-7.475,-0.975) W7(-6.825,-0.975) W8(-6.175,-0.975) W9(-5.525,-0.975) W10(-4.875,-0.975) W11(-4.225,-0.975) W12(-3.575,-0.975) W13(-2.925,-0.975) W14(-2.275,-0.975) W15(-1.625,-0.975) W16(-0.975,-0.975) W17(-0.325,-0.975) W18(0.325,-0.975) W19(0.975,-0.975) W20(1.625,-0.975) W21(2.275,-0.975) W22(2.925,-0.975) W23(3.575,-0.975) W24(4.225,-0.975) W25(4.875,-0.975) W26(5.525,-0.975) W27(6.175,-0.975) W28(6.825,-0.975) W29(7.475,-0.975) W30(8.125,-0.975) W31(8.775,-0.975) W32(9.425,-0.975) W33(10.075,-0.975) W34(10.725,-0.975) Y1(-10.725,-1.625) Y2(-10.075,-1.625) Y3(-9.425,-1.625) Y4(-8.775,-1.625) Y5(-8.125,-1.625) Y6(-7.475,-1.625) Y7(-6.825,-1.625) Y8(-6.175,-1.625) Y9(-5.525,-1.625) Y10(-4.875,-1.625) Y11(-4.225,-1.625) Y12(-3.575,-1.625) Y13(-2.925,-1.625) Y14(-2.275,-1.625) Y15(-1.625,-1.625) Y16(-0.975,-1.625) Y17(-0.325,-1.625) Y18(0.325,-1.625) Y19(0.975,-1.625) Y20(1.625,-1.625) Y21(2.275,-1.625) Y22(2.925,-1.625) Y23(3.575,-1.625) Y24(4.225,-1.625) Y26(5.525,-1.625) Y27(6.175,-1.625) Y28(6.825,-1.625) Y29(7.475,-1.625) Y30(8.125,-1.625) Y31(8.775,-1.625) Y32(9.425,-1.625) Y33(10.075,-1.625) Y34(10.725,-1.625)
  silkscreen extent -12.5,-12.5 12.5,12.5, body extent -11.5,-11.5 11.5,11.5, height 3.81
C0201_L [mm] "贴片MLCC电容"
  rect 0.3x0.4 smd: 1(-0.3,0) 2(0.3,0)
  silkscreen extent -0.61,-0.38 0.61,0.38, body extent -0.3,-0.15 0.3,0.15, height 0.3
C0402_L [mm] "贴片MLCC电容"
  rect 0.5x0.5 smd: 1(-0.45,0) 2(0.45,0)
  silkscreen extent -0.87,-0.46 0.88,0.46, body extent -0.5,-0.25 0.5,0.25, height 0.5
C0603_L [mm] "贴片MLCC电容"
  rect 0.75x0.85 smd: 1(-0.725,0) 2(0.725,0)
  silkscreen extent -1.35,-0.69 1.35,0.69, body extent -0.8,-0.4 0.8,0.4, height 0.8
C0805_L [mil] "贴片MLCC电容"
  rect 35x50 smd: 1(-37.4,0) 2(37.4,0)
  silkscreen extent -67,-36 67,36, body extent -39,-26 39,26, height 51
DFN1006-2L-BI [mm]
  rect 0.45x0.55 smd paste+0 mask+0.051: 1(-0.425,0) 2(0.425,0)
  silkscreen extent -0.8,-0.4 0.8,0.4
F_100PIN [mm] "0.5双槽板对板母座，100P"
  rect 2x0.25 smd: 1(-2,12.25) 2(-2,11.75) 3(-2,11.25) 4(-2,10.75) 5(-2,10.25) 6(-2,9.75) 7(-2,9.25) 8(-2,8.75) 9(-2,8.25) 10(-2,7.75) 11(-2,7.25) 12(-2,6.75) 13(-2,6.25) 14(-2,5.75) 15(-2,5.25) 16(-2,4.75) 17(-2,4.25) 18(-2,3.75) 19(-2,3.25) 20(-2,2.75) 21(-2,2.25) 22(-2,1.75) 23(-2,1.25) 24(-2,0.75) 25(-2,0.25) 26(-2,-0.25) 27(-2,-0.75) 28(-2,-1.25) 29(-2,-1.75) 30(-2,-2.25) 31(-2,-2.75) 32(-2,-3.25) 33(-2,-3.75) 34(-2,-4.25) 35(-2,-4.75) 36(-2,-5.25) 37(-2,-5.75) 38(-2,-6.25) 39(-2,-6.75) 40(-2,-7.25) 41(-2,-7.75) 42(-2,-8.25) 43(-2,-8.75) 44(-2,-9.25) 45(-2,-9.75) 46(-2,-10.25) 47(-2,-10.75) 48(-2,-11.25) 49(-2,-11.75) 50(-2,-12.25) 51(2,-12.25) 52(2,-11.75) 53(2,-11.25) 54(2,-10.75) 55(2,-10.25) 56(2,-9.75) 57(2,-9.25) 58(2,-8.75) 59(2,-8.25) 60(2,-7.75) 61(2,-7.25) 62(2,-6.75) 63(2,-6.25) 64(2,-5.75) 65(2,-5.25) 66(2,-4.75) 67(2,-4.25) 68(2,-3.75) 69(2,-3.25) 70(2,-2.75) 71(2,-2.25) 72(2,-1.75) 73(2,-1.25) 74(2,-0.75) 75(2,-0.25) 76(2,0.25) 77(2,0.75) 78(2,1.25) 79(2,1.75) 80(2,2.25) 81(2,2.75) 82(2,3.25) 83(2,3.75) 84(2,4.25) 85(2,4.75) 86(2,5.25) 87(2,5.75) 88(2,6.25) 89(2,6.75) 90(2,7.25) 91(2,7.75) 92(2,8.25) 93(2,8.75) 94(2,9.25) 95(2,9.75) 96(2,10.25) 97(2,10.75) 98(2,11.25) 99(2,11.75) 100(2,12.25)
  silkscreen extent -2.54,-13.85 2,14.48
FB0402 [mm] "0402贴片磁珠"
  rect 0.5x0.5 smd: 1(-0.45,0) 2(0.45,0)
  silkscreen extent -0.87,-0.46 0.88,0.46, body extent -0.51,-0.26 0.51,0.26, height 0.52
FBGA-153 [mm] "联系卖家 免费查找封装"
  round 0.25 smd mask+0.051: A1(-3.25,-3.25) A2(-3.25,-2.75) A3(-3.25,-2.25) A4(-3.25,-1.75) A5(-3.25,-1.25) A6(-3.25,-0.75) A7(-3.25,-0.25) A8(-3.25,0.25) A9(-3.25,0.75) A10(-3.25,1.25) A11(-3.25,1.75) A12(-3.25,2.25) A13(-3.25,2.75) A14(-3.25,3.25) B1(-2.75,-3.25) B2(-2.75,-2.75) B3(-2.75,-2.25) B4(-2.75,-1.75) B5(-2.75,-1.25) B6(-2.75,-0.75) B7(-2.75,-0.25) B8(-2.75,0.25) B9(-2.75,0.75) B10(-2.75,1.25) B11(-2.75,1.75) B12(-2.75,2.25) B13(-2.75,2.75) B14(-2.75,3.25) C1(-2.25,-3.25) C2(-2.25,-2.75) C3(-2.25,-2.25) C4(-2.25,-1.75) C5(-2.25,-1.25) C6(-2.25,-0.75) C7(-2.25,-0.25) C8(-2.25,0.25) C9(-2.25,0.75) C10(-2.25,1.25) C11(-2.25,1.75) C12(-2.25,2.25) C13(-2.25,2.75) C14(-2.25,3.25) D1(-1.75,-3.25) D2(-1.75,-2.75) D3(-1.75,-2.25) D4(-1.75,-1.75) D12(-1.75,2.25) D13(-1.75,2.75) D14(-1.75,3.25) E1(-1.25,-3.25) E2(-1.25,-2.75) E3(-1.25,-2.25) E5(-1.25,-1.25) E6(-1.25,-0.75) E7(-1.25,-0.25) E8(-1.25,0.25) E9(-1.25,0.75) E10(-1.25,1.25) E12(-1.25,2.25) E13(-1.25,2.75) E14(-1.25,3.25) F1(-0.75,-3.25) F2(-0.75,-2.75) F3(-0.75,-2.25) F5(-0.75,-1.25) F10(-0.75,1.25) F12(-0.75,2.25) F13(-0.75,2.75) F14(-0.75,3.25) G1(-0.25,-3.25) G2(-0.25,-2.75) G3(-0.25,-2.25) G5(-0.25,-1.25) G10(-0.25,1.25) G12(-0.25,2.25) G13(-0.25,2.75) G14(-0.25,3.25) H1(0.25,-3.25) H2(0.25,-2.75) H3(0.25,-2.25) H5(0.25,-1.25) H10(0.25,1.25) H12(0.25,2.25) H13(0.25,2.75) H14(0.25,3.25) J1(0.75,-3.25) J2(0.75,-2.75) J3(0.75,-2.25) J5(0.75,-1.25) J10(0.75,1.25) J12(0.75,2.25) J13(0.75,2.75) J14(0.75,3.25) K1(1.25,-3.25) K2(1.25,-2.75) K3(1.25,-2.25) K5(1.25,-1.25) K6(1.25,-0.75) K7(1.25,-0.25) K8(1.25,0.25) K9(1.25,0.75) K10(1.25,1.25) K12(1.25,2.25) K13(1.25,2.75) K14(1.25,3.25) L1(1.75,-3.25) L2(1.75,-2.75) L3(1.75,-2.25) L12(1.75,2.25) L13(1.75,2.75) L14(1.75,3.25) M1(2.25,-3.25) M2(2.25,-2.75) M3(2.25,-2.25) M4(2.25,-1.75) M5(2.25,-1.25) M6(2.25,-0.75) M7(2.25,-0.25) M8(2.25,0.25) M9(2.25,0.75) M10(2.25,1.25) M11(2.25,1.75) M12(2.25,2.25) M13(2.25,2.75) M14(2.25,3.25) N1(2.75,-3.25) N2(2.75,-2.75) N3(2.75,-2.25) N4(2.75,-1.75) N5(2.75,-1.25) N6(2.75,-0.75) N7(2.75,-0.25) N8(2.75,0.25) N9(2.75,0.75) N10(2.75,1.25) N11(2.75,1.75) N12(2.75,2.25) N13(2.75,2.75) N14(2.75,3.25) P1(3.25,-3.25) P2(3.25,-2.75) P3(3.25,-2.25) P4(3.25,-1.75) P5(3.25,-1.25) P6(3.25,-0.75) P7(3.25,-0.25) P8(3.25,0.25) P9(3.25,0.75) P10(3.25,1.25) P11(3.25,1.75) P12(3.25,2.25) P13(3.25,2.75) P14(3.25,3.25)
  silkscreen extent -6.86,-6.22 6.61,5.84, body extent -6.4,-5.75 6.6,5.75, height 1.15
FBGA-200_L15.0-W10.0-BL_K4F6E3S4HM [mm]
  round 0.28 smd paste+0 mask+0.05: A1(-6.711,-4.214) A2(-6.711,-3.414) A3(-6.711,-2.614) A4(-6.711,-1.814) A5(-6.711,-1.014) A8(-6.711,1.386) A9(-6.711,2.186) A10(-6.711,2.986) A11(-6.711,3.786) A12(-6.711,4.586) AA1(6.289,-4.214) AA2(6.289,-3.414) AA3(6.289,-2.614) AA4(6.289,-1.814) AA5(6.289,-1.014) AA8(6.289,1.386) AA9(6.289,2.186) AA10(6.289,2.986) AA11(6.289,3.786) AA12(6.289,4.586) AB1(6.939,-4.214) AB2(6.939,-3.414) AB3(6.939,-2.614) AB4(6.939,-1.814) AB5(6.939,-1.014) AB8(6.939,1.386) AB9(6.939,2.186) AB10(6.939,2.986) AB11(6.939,3.786) AB12(6.939,4.586) B1(-6.061,-4.214) B2(-6.061,-3.414) B3(-6.061,-2.614) B4(-6.061,-1.814) B5(-6.061,-1.014) B8(-6.061,1.386) B9(-6.061,2.186) B10(-6.061,2.986) B11(-6.061,3.786) B12(-6.061,4.586) C1(-5.411,-4.214) C2(-5.411,-3.414) C3(-5.411,-2.614) C4(-5.411,-1.814) C5(-5.411,-1.014) C8(-5.411,1.386) C9(-5.411,2.186) C10(-5.411,2.986) C11(-5.411,3.786) C12(-5.411,4.586) D1(-4.761,-4.214) D2(-4.761,-3.414) D3(-4.761,-2.614) D4(-4.761,-1.814) D5(-4.761,-1.014) D8(-4.761,1.386) D9(-4.761,2.186) D10(-4.761,2.986) D11(-4.761,3.786) D12(-4.761,4.586) E1(-4.111,-4.214) E2(-4.111,-3.414) E3(-4.111,-2.614) E4(-4.111,-1.814) E5(-4.111,-1.014) E8(-4.111,1.386) E9(-4.111,2.186) E10(-4.111,2.986) E11(-4.111,3.786) E12(-4.111,4.586) F1(-3.461,-4.214) F2(-3.461,-3.414) F3(-3.461,-2.614) F4(-3.461,-1.814) F5(-3.461,-1.014) F8(-3.461,1.386) F9(-3.461,2.186) F10(-3.461,2.986) F11(-3.461,3.786) F12(-3.461,4.586) G1(-2.811,-4.214) G2(-2.811,-3.414) G3(-2.811,-2.614) G4(-2.811,-1.814) G5(-2.811,-1.014) G8(-2.811,1.386) G9(-2.811,2.186) G10(-2.811,2.986) G11(-2.811,3.786) G12(-2.811,4.586) H1(-2.161,-4.214) H2(-2.161,-3.414) H3(-2.161,-2.614) H4(-2.161,-1.814) H5(-2.161,-1.014) H8(-2.161,1.386) H9(-2.161,2.186) H10(-2.161,2.986) H11(-2.161,3.786) H12(-2.161,4.586) J1(-1.511,-4.214) J2(-1.511,-3.414) J3(-1.511,-2.614) J4(-1.511,-1.814) J5(-1.511,-1.014) J8(-1.511,1.386) J9(-1.511,2.186) J10(-1.511,2.986) J11(-1.511,3.786) J12(-1.511,4.586) K1(-0.861,-4.214) K2(-0.861,-3.414) K3(-0.861,-2.614) K4(-0.861,-1.814) K5(-0.861,-1.014) K8(-0.861,1.386) K9(-0.861,2.186) K10(-0.861,2.986) K11(-0.861,3.786) K12(-0.861,4.586) N1(1.089,-4.214) N2(1.089,-3.414) N3(1.089,-2.614) N4(1.089,-1.814) N5(1.089,-1.014) N8(1.089,1.386) N9(1.089,2.186) N10(1.089,2.986) N11(1.089,3.786) N12(1.089,4.586) P1(1.739,-4.214) P2(1.739,-3.414) P3(1.739,-2.614) P4(1.739,-1.814) P5(1.739,-1.014) P8(1.739,1.386) P9(1.739,2.186) P10(1.739,2.986) P11(1.739,3.786) P12(1.739,4.586) R1(2.389,-4.214) R2(2.389,-3.414) R3(2.389,-2.614) R4(2.389,-1.814) R5(2.389,-1.014) R8(2.389,1.386) R9(2.389,2.186) R10(2.389,2.986) R11(2.389,3.786) R12(2.389,4.586) T1(3.039,-4.214) T2(3.039,-3.414) T3(3.039,-2.614) T4(3.039,-1.814) T5(3.039,-1.014) T8(3.039,1.386) T9(3.039,2.186) T10(3.039,2.986) T11(3.039,3.786) T12(3.039,4.586) U1(3.689,-4.214) U2(3.689,-3.414) U3(3.689,-2.614) U4(3.689,-1.814) U5(3.689,-1.014) U8(3.689,1.386) U9(3.689,2.186) U10(3.689,2.986) U11(3.689,3.786) U12(3.689,4.586) V1(4.339,-4.214) V2(4.339,-3.414) V3(4.339,-2.614) V4(4.339,-1.814) V5(4.339,-1.014) V8(4.339,1.386) V9(4.339,2.186) V10(4.339,2.986) V11(4.339,3.786) V12(4.339,4.586) W1(4.989,-4.214) W2(4.989,-3.414) W3(4.989,-2.614) W4(4.989,-1.814) W5(4.989,-1.014) W8(4.989,1.386) W9(4.989,2.186) W10(4.989,2.986) W11(4.989,3.786) W12(4.989,4.586) Y1(5.639,-4.214) Y2(5.639,-3.414) Y3(5.639,-2.614) Y4(5.639,-1.814) Y5(5.639,-1.014) Y8(5.639,1.386) Y9(5.639,2.186) Y10(5.639,2.986) Y11(5.639,3.786) Y12(5.639,4.586)
  silkscreen extent -7.69,-5.34 7.69,5.26
L0805 [mm] "0805贴片叠层电感                     联系卖家 免费人工查找封装"
  rect 1x1.3 smd: 1(-0.95,0) 2(0.95,0)
  silkscreen extent -1.7,-0.89 1.7,0.89, body extent -1,-0.65 1,0.65, height 1.3
LED0603_R [mil] "红色0603LED"
  rect 30x30 smd: 1(-30,0) 2(30,0)
  silkscreen extent -53,-23 61,23, body extent -31,-16 32,16, height 18
QFN68_7R00X7R00X0R80_T [mil] "QFN68_7R00X7R00X0R80_T"
  oval 31.5x7.87 smd: 1(-137.8,110.24)
  rect 31.5x7.87 smd: 2(-137.8,96.46) 3(-137.8,82.68) 4(-137.8,68.9) 5(-137.8,55.12) 6(-137.8,41.34) 7(-137.8,27.56) 8(-137.8,13.78) 9(-137.8,0) 10(-137.8,-13.78) 11(-137.8,-27.56) 12(-137.8,-41.34) 13(-137.8,-55.12) 14(-137.8,-68.9) 15(-137.8,-82.68) 16(-137.8,-96.46) 17(-137.8,-110.24) 35(137.8,-110.24) 36(137.8,-96.46) 37(137.8,-82.68) 38(137.8,-68.9) 39(137.8,-55.12) 40(137.8,-41.34) 41(137.8,-27.56) 42(137.8,-13.78) 43(137.8,0) 44(137.8,13.78) 45(137.8,27.56) 46(137.8,41.34) 47(137.8,55.12) 48(137.8,68.9) 49(137.8,82.68) 50(137.8,96.46) 51(137.8,110.24)
  rect 7.87x31.5 smd: 18(-110.24,-137.8) 19(-96.46,-137.8) 20(-82.68,-137.8) 21(-68.9,-137.8) 22(-55.12,-137.8) 23(-41.34,-137.8) 24(-27.56,-137.8) 25(-13.78,-137.8) 26(0,-137.8) 27(13.78,-137.8) 28(27.56,-137.8) 29(41.34,-137.8) 30(55.12,-137.8) 31(68.9,-137.8) 32(82.68,-137.8) 33(96.46,-137.8) 34(110.24,-137.8) 52(110.24,137.8) 53(96.46,137.8) 54(82.68,137.8) 55(68.9,137.8) 56(55.12,137.8) 57(41.34,137.8) 58(27.56,137.8) 59(13.78,137.8) 60(0,137.8) 61(-13.78,137.8) 62(-27.56,137.8) 63(-41.34,137.8) 64(-55.12,137.8) 65(-68.9,137.8) 66(-82.68,137.8) 67(-96.46,137.8) 68(-110.24,137.8)
  rect 220.47x220.47 smd: 69(0,0)
  silkscreen extent -189,-138 138,138, body extent -156,-143 156,143, height 150
R0201_L [mm] "1/20W贴片电阻"
  rect 0.3x0.4 smd: 1(-0.275,0) 2(0.275,0)
  silkscreen extent -0.61,-0.38 0.61,0.38, body extent -0.3,-0.15 0.3,0.15, height 0.23
R0402_L [mm] "1/16W贴片电阻"
  rect 0.5x0.5 smd: 1(-0.425,0) 2(0.425,0)
  silkscreen extent -0.88,-0.46 0.87,0.46, body extent -0.5,-0.25 0.5,0.25, height 0.3
R0603_L [mm] "1/10W贴片电阻"
  rect 0.75x0.85 smd: 1(-0.725,0) 2(0.725,0)
  silkscreen extent -1.35,-0.69 1.35,0.69, body extent -0.8,-0.4 0.8,0.4, height 0.4
SH1.0-WT-7P [mm] "SH1.0连接器-卧贴-7P"
  rect 1.4x1.8 smd: 0(-4.3,-1.8) 0(4.3,-1.8)
  rect 0.6x1.9 smd: 1(3,1.8) 2(2,1.8) 3(1,1.8) 4(0,1.8) 5(-1,1.8) 6(-2,1.8) 7(-3,1.8)
  silkscreen extent -4.4,-2.67 4.4,1.6, body extent -4.51,-2.6 4.49,2.35, height 2.9
SOD-523_L1.2-W0.8-LS1.6-RD [mm]
  rect 0.6x0.36 smd paste+0 mask+0.051: 1(-0.63,0) 2(0.67,0)
  silkscreen extent -0.89,-0.55 0.7,0.55
SOT23-5 [mm] "SOT23, 5-Leads, Body 2.9x1.6mm, Pitch 0.95mm, IPC Medium Density                联系卖家 免费查找封装"
  rect 1.05x0.6 smd: 1(-1.2,0.95) 2(-1.2,0) 3(-1.2,-0.95) 4(1.2,-0.95) 5(1.2,0.95)
  silkscreen extent -1.32,-1.55 0.3,1.92, body extent -1.4,-1.5 1.4,1.5, height 1.15
SOT-23-3_L2.9-W1.3-P1.90-LS2.4-TL [mm]
  rect 1.25x0.7 smd paste+0 mask+0.051: 1(-1.235,0.95) 2(-1.235,-0.95) 3(1.265,0)
  silkscreen extent -0.65,-1.46 0.67,1.46
SOT-23-5_L3.0-W1.7-P0.95-LS2.8-BL [mm]
  rect 0.49x1.157 smd paste+0 mask+0.051: 1(1.679,-1.712) 2(2.629,-1.712) 3(3.579,-1.712)
  rect 0.49x1.175 smd paste+0 mask+0.051: 4(3.579,0.595) 5(1.679,0.595)
  silkscreen extent 0.83,-1.85 4.16,0.29
SOT-23-5_L3.0-W1.7-P0.95-LS2.8-BR [mm]
  rect 1.1x0.6 smd paste+0 mask+0.051: 1(1.3,-0.95) 2(1.3,0) 3(1.3,0.95) 4(-1.3,0.95) 5(-1.3,-0.95)
  silkscreen extent -0.9,-1.55 0.9,1.55
SW-SMD_L3.9-W2.9-P4.15-LS5.0 [mm]
  rect 1.35x2 smd paste+0 mask+0.051: 1(-2.25,0) 2(2.25,0)
  silkscreen extent -2,-1.45 2,1.45
USB-C-SMD_ZX-TYPEC-WTM1628 [mm]
  rect 1.5x1.5 smd paste+0 mask+0.051: 13(-5.12,2.817) 14(-5.12,-1.113) 15(5.12,2.817) 16(5.12,-1.113)
  rect 0.6x1.15 smd paste+0 mask+0.051: A1B12(-3.2,3.392) A4B9(-2.4,3.392) B1A12(3.2,3.392) B4A9(2.4,3.392)
  rect 0.3x1.15 smd paste+0 mask+0.051: A5(-1.25,3.392) A6(-0.25,3.392) A7(0.25,3.392) A8(1.25,3.392) B5(1.75,3.392) B6(0.75,3.392) B7(-0.75,3.392) B8(-1.75,3.392)
  round 0.65 hole 0.65 unplated paste+0: ""(-2.89,2.249) ""(2.89,2.249)
  silkscreen extent -4.45,-3.59 4.45,3.77
WLCSP-20_L2.0-W1.6-R5-C4-P0.40-TL [mm]
  round 0.2 smd paste-100 mask+0.05: A1(-0.47,0.8) A2(-0.07,0.8) A3(0.33,0.8) A4(0.73,0.8) B1(-0.47,0.4) B2(-0.07,0.4) B3(0.33,0.4) B4(0.73,0.4) C1(-0.47,0) C2(-0.07,0) C3(0.33,0) C4(0.73,0) D1(-0.47,-0.4) D2(-0.07,-0.4) D3(0.33,-0.4) D4(0.73,-0.4) E1(-0.47,-0.8) E2(-0.07,-0.8) E3(0.33,-0.8) E4(0.73,-0.8)
  silkscreen extent -0.99,-1 0.94,1
WSON-8_L8.0-W6.0-P1.27-TL-EP-1 [mm]
  rect 1x0.6 smd paste+0 mask+0.05: 1(-3.75,1.905) 2(-3.75,0.635) 3(-3.75,-0.635) 4(-3.75,-1.905) 5(4.05,-1.905) 6(4.05,-0.635) 7(4.05,0.635) 8(4.05,1.905)
  rect 3.4x4.3 smd paste+0 mask+0.05: 9(0.15,0)
  silkscreen extent -4.55,-3 4.15,3
XTAL-3225-4P [mm] "3.2*2.5*0.7mm(长宽高)                             淘宝ID:黄晶宝石"
  rect 1.3x1.2 smd: 1(-1.05,-0.85) 2(1.05,-0.85) 3(1.05,0.85) 4(-1.05,0.85)
  silkscreen extent -2.03,-1.75 1.9,1.65, body extent -1.6,-1.25 1.6,1.25, height 0.7

## Part data
C1 C2 C3 C4 C5 C6 C7 C8 C9 C10 C11 C12 C13 C14 C15 C16 C17 C18 C19 C20 C21 C22 C23 C24 C25 C26 C27 C28 C29 C30 C31 C32 C33 C34 C35 C36 C37 C38 C39 C40 C41 C42 C43 C44 C45 C46 C47 C48 C49 C50 C51 C52 C53 C54 C55 C56 C57 C58 C59 C60 C61 C62 C63 C64 C65 C66 C67 C68 C69 C70 C71 C72 C73 C74 C75 C76 C77 C78 C79 C80 C81 C82 C83 C84 C85 C86 C87 C88 C89 C90 C91 C92 C93 C94 C95 C96 C97 C98 C99 C100 C101 C102 C103 C104 C105 C106 C107 C108 C109 C110 C111 C112 C113 C114 C115 C116 C117 C118 C119 C120 C121 C122 C123 C124 C125 C126 C127 C128 C129 C130 C131 C132 C133 C134 C135 C136 C137 C138 C139 C140 C141 C142 C143 C144 C145 C146 C147 C148 C149 C150 C151 C152 C153 C154 C155 C156 C157 C158 C159 C160 C161 C162 C163 C164 C165 C166 C167 C168 C169 C170 C171 C172 C173 C174 C175 C176 C177 C178 C179 C180 C181 C182 C183 C184 C185 C186 C187 C188 C189 C190 C191 C192 C193 C194 C195 C196 C197 C198 C199 C200 C201 C202 C203 C204 C205 C206 C207 C208 C209 C210 C211 C212 C213 C214 C215 C216 C217 C218 C219 C220 C221 C222 C223 C224 C225 C226 C227 C228 C229 C230 C231 C232 C233 C234 C237 C239 C240 C241 C242 C244 C245 C248 C249 C252 C253 C256 C257 C260 C262 C263 C264 C265 C266 C267 C270 C272 C273 C274 C277 C278 C279 C280 C281 C282 C283 C284 C285 C286 C287 C288 C291 C292 C293 C294 C295 C296 C297 C298 C299 C300 C301 C302 C303 C304 C305 C306 C307 C308 C309 C310 C311 C312 C313 C314 C315 C316 C317 C318 C319 C320 C321 C322 C323 C324 C325 C326 C327 C328 C329 C330 C331 C332 C333 C334 C335 C336 C337 C338 C339 C340 C341 C342 C343 C344 C345 C346 C347 C348 C349 C350 C351 C352 C353 C354 C355 C356 C357 C358 C359 C360 C361 C362 C363 C364 C365 C366 C367 C368 C369 C370 C371 C372 C373 C374 C375 C376 C377 C378 C379 C380 C381 C382 C383 C384 C385 C386 C387 C388 C389 C390 C391 C392 C393 C394 C395 C396 C397 C398 C399 C400 C401 C402 C403: library part C, "贴片电容/MLCC电容", BOM名称=无极性贴片电容, 联系下单店铺卖家 免费帮你查找封装="联系下单店铺卖家 免费技术支持"
FB1: library part FB, "贴片磁珠", BOM名称=直插磁珠, 联系下单店铺卖家 免费帮你查找封装="联系下单店铺卖家 免费技术支持"
JP1: library part "Header 7", "7P连接器", BOM名称=7P连接器, 封装库来自淘宝卖家：黄晶宝石=获取最新版本https://shop463601444.taobao.com
L1 L2 L3 L4 L5 L6 L7 L8 L9 L10 L11 L12 L13 L14: library part L, "贴片小功率电感", BOM名称=小功率贴片电感, 联系下单店铺卖家 免费帮你查找封装="联系下单店铺卖家 免费技术支持"
LED1 LED2: library part LED, "贴片LED", BOM名称=贴片LED, 封装库来自淘宝卖家：黄晶宝石=其他店铺购入均为盗版封装库，无更新权益，请立即申请退款，本店现金奖励200~1000元
R1 R2 R3 R4 R5 R6 R7 R8 R9 R10 R11 R12 R13 R14 R15 R16 R17 R18 R19 R20 R21 R22 R23 R24 R25 R26 R27 R28 R29 R30 R31 R32 R33 R34 R35 R36 R37 R38 R39 R40 R41 R42 R43 R44 R45 R46 R47 R48 R49 R50 R51 R52 R53 R54 R55 R56 R57 R58 R59 R60 R61 R62 R63 R64 R65 R67 R69 R70 R72 R73 R83 R84 R85 R86 R87 R88 R89 R90 R93 R94 R95 R96 R97 R98 R99 R100 R101 R102 R103 R104 R105 R106 R107 R108 R109 R110 R111 R112 R113 R114 R115 R116 R117 R118 R119 R120 R121 R122 R123 R124 R125 R126 R127 R128 R129 R130 R131 R132 R133 R134 R135 R136 R137 R138 R139 R140 R141 R142 R143 R144 R145 R146 R147: library part R, "贴片电阻", BOM名称=贴片电阻, 联系下单店铺卖家 免费帮你查找封装="联系下单店铺卖家 免费技术支持"
U8: library part SOC_RK3588, "ROCKCHIP SOC", Manufacturer="Rockchip (瑞芯微)", Created by=YWQ, Manufacturer PN=RK3588, Part Type=SOC, PCB Footprint=BGA1088_23R00X23R00X2R00, Priority=A, RK PN=RK3588, SPLIT_INST=TRUE, SWAP_INFO=(S1+S2+S3+S4+S5+S6+S7+S8+S9+S10+S11+S12+S13+S14+S15+S16+S17+S18+S19+S20+S21+S22+S23+S24+S25+S26)
U11: "32GB EMMC5.1", BOM名称=KLMBG2JETD-B041A, 封装库来自淘宝卖家：黄晶宝石=其他店铺购入均为盗版封装库，请立即申请退款，本店现金奖励100~500元
U14 U16: "三态输出单路总线缓冲器闸", 当前库版本V2023.10.25 @淘宝卖家:黄晶宝石=最新版本发布https://item.taobao.com/item.htm?id=566775463719
X1: library part XTAL-4P, "4脚无源晶振(谐振器）", BOM名称=4脚无源晶振(谐振器）, 联系下单店铺卖家 免费帮你查找封装="联系下单店铺卖家 免费技术支持"

## Via types
v1: diameter 0.41, hole 0.3, Top Layer to Bottom Layer, tented both sides, 1901 vias
v2: diameter 0.41, hole 0.3, Top Layer to Bottom Layer, 8 vias

## Nets (pads, with @x,y where several pads share a name; then routed paths per layer and width w, separated by ;. In a path a pad name is that pad's centre, name@x,y a point inside that pad or via, vN(x,y) a via of type N, cw(c..) or ccw(c..) an arc to the next point about the centre after c; other vN are vias at no path point)
AUTO_PWRON_EN: BTB_1.86 C70.2 R128.1 | length 60
  Top Layer w0.102: v1(8.96,38.022) 9.173,37.809 9.214,37.809 9.362,37.661 12.18,37.661 13.179,38.66 13.179,39.251 13.179,39.286 13.134,39.331 13.134,39.5 13.351,39.716 14.846,39.716 15.917,40.788 16.37,40.788 17.027,41.445 v1(17.034,41.445) ; R128.1@11.101,2.97 12.643,4.512 v1(12.643,6.627)
  Layer 4 w0.102: v1(8.96,38.022) 9.443,37.539 9.443,36.042 9.158,35.757 9.158,34.374 9.929,33.603 10.741,32.791 10.741,30.78 9.913,29.953 9.774,29.953 8.505,28.683 8.505,22.675 11.116,20.064 11.687,20.064 11.928,20.304 v1(11.952,20.304)
  Bottom Layer w0.102: BTB_1.86@11.044,0.988 v1@11.044,2.858 ; v1(11.952,20.304) 12.011,20.245 12.011,19.843 12.064,19.791 12.064,19.678 12.135,19.607 16.555,19.607 17.241,18.921 17.241,15.441 16.936,15.136 16.936,13.858 17.596,13.198 17.596,11.374 14.17,7.948 13.186,7.948 13.126,7.888 13.126,7.11 v1(12.643,6.627)
  other v1: 11.058,2.872